# Altium PCB PCB_Bass_Tuner.PcbDoc
Units mm, origin at the board's own origin, x right, y up, seen from the top; angles counter-clockwise.
Board outline 33.66 x 66.04 mm, 2 copper layers (Top Layer, Bottom Layer); 29 components, 38 nets, 151 pads, 0 vias.
Unrouted connection lines stored in the file: 90.
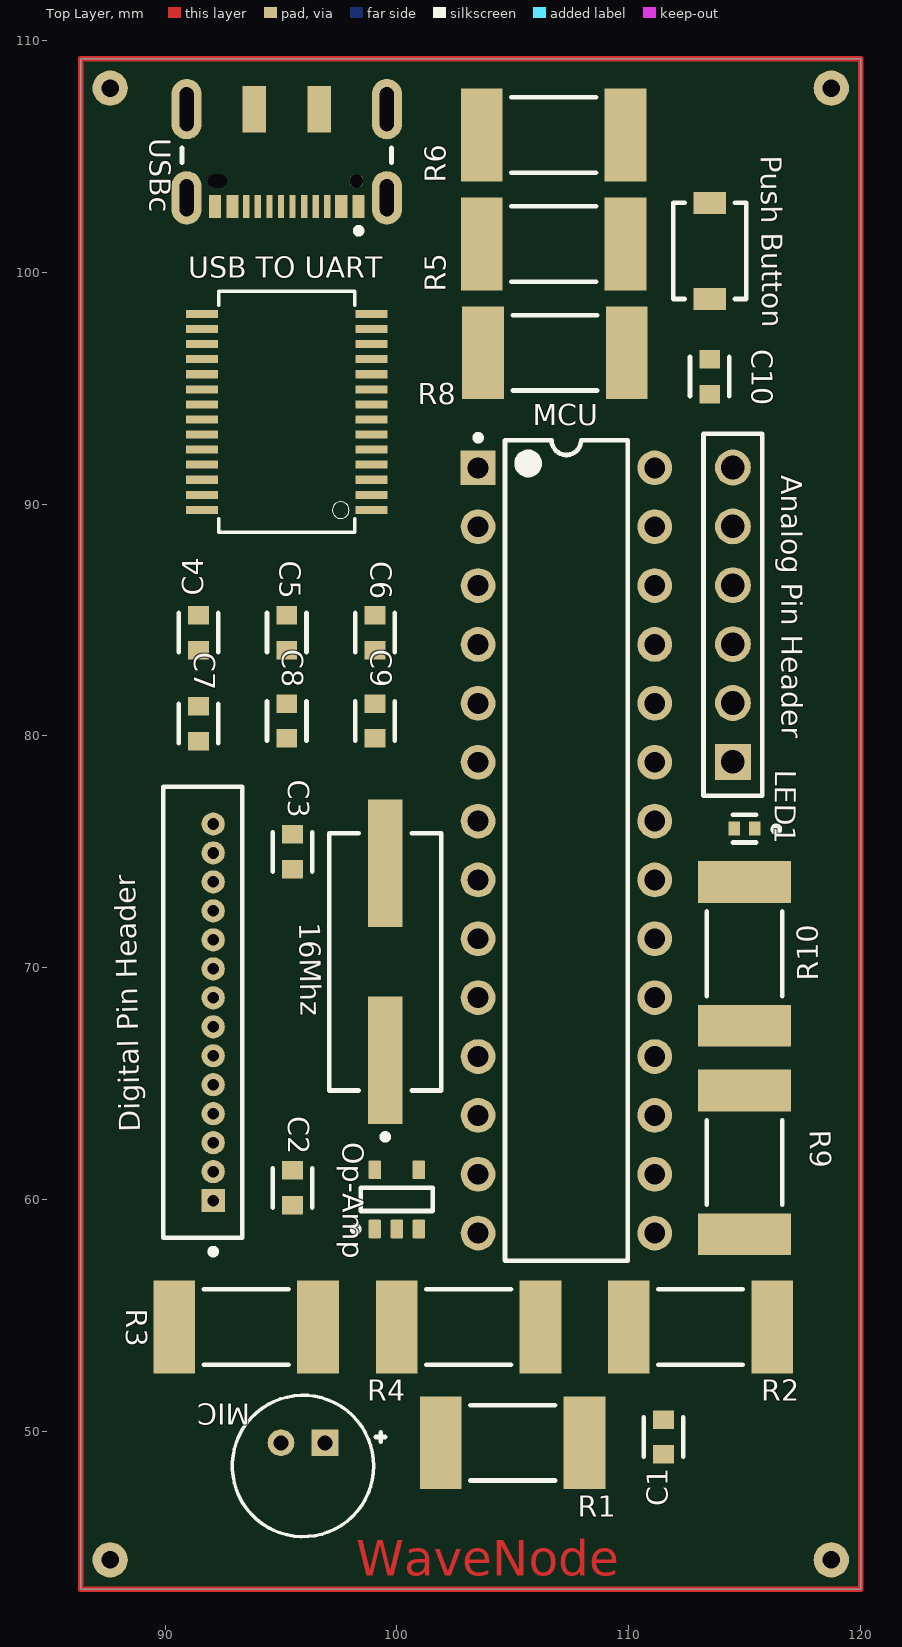
[diagram p0: Top Layer view]
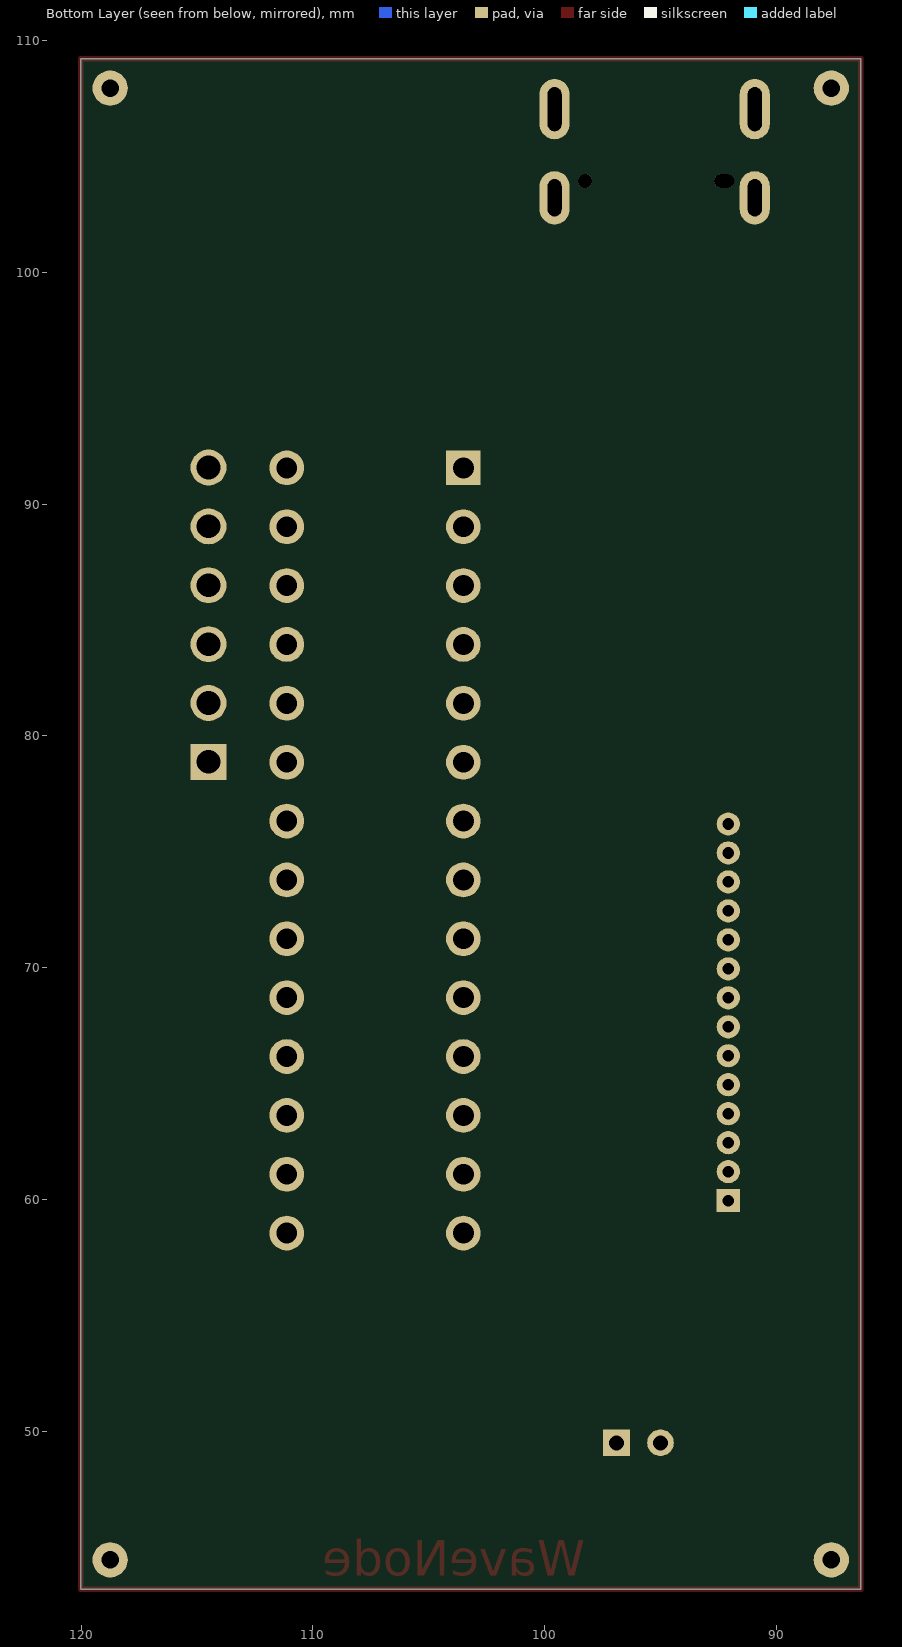
[diagram p1: Bottom Layer view, seen from below]

## Layer stack, top to bottom
Top Solder: solder mask 0.0102, Solder Resist, Dk 3.5
Top Layer: signal copper 0.0356
Dielectric 1: dielectric 0.32, FR-4, Dk 4.8
Bottom Layer: signal copper 0.0356
Bottom Solder: solder mask 0.0102, Solder Resist, Dk 3.5

## Board outline
86.36,43.18 86.36,109.22 120.015,109.22 120.015,43.18

## Design rules (kind name [scope] priority, off if disabled: settings)
Clearance [All] p1: gap=0.2 ignorepadtopadclearanceinfootprint=FALSE
DiffPairsRouting [All] p1: maxlimit=0.254 minlimit=0.254 mostfreqgap=0.254 toplayer_minwidth=0.381 toplayer_maxwidth=0.381 toplayer_prefwidth=0.381 bottomlayer_minwidth=0.381 bottomlayer_maxwidth=0.381 bottomlayer_prefwidth=0.381 maxuncoupledlength=12.7
PolygonConnect [All] p1: connectstyle=Relief reliefconductorwidth=0.254 reliefentries=4 polygonreliefangle="90 Angle" airgapwidth=0.254
RoutingVias [All] p1: holewidth=0.711 width=1.27 viastyle="Through Hole" minholewidth=0.711 minwidth=1.27 maxholewidth=0.711 maxwidth=1.27
SMDNeckDown [All] p1: percent=50.000
SolderMaskExpansion [All] p1: expansion=0.102 istentingtop=FALSE
SupplyNets "Schematic Supply Nets_1" [InNet('Ground')] p1: voltage=0.000
SupplyNets "Schematic Supply Nets" [InNet('VCC')] p2: voltage=0.000
UnRoutedNet [All] p1: checkbadconnections=TRUE
Width [All] p1: maxlimit=1 minlimit=0.127 preferedwidth=0.2 minimp=50.000000 maximp=50.000000 favimp=50.000000
28 further rules are at their usual default settings.

## Classes and differential pairs
differential pair USB_D: +USB_D_P -USB_D_N

## Components (designator, comment, footprint, x,y, rotation, side; value= is the part's Value field where it differs from the comment)
16Mhz "ATS16ASM-1" CTS-ATS-SM-XTAL-2 99.5,70.25 r90 top
"Analog Pin Header" "TSW-106-07-T-S" SMTC-TSW-106-07-X-S 114.5,78.88 r90 top
C1 "10u" FP-CC0603-DA-MFG 111.5,49.75 r90 top value="22 nF"
C2 "100n" FP-CC0603-DA-MFG 95.5,60.5 r270 top value="22 nF"
C3 "100n" FP-CC0603-DA-MFG 95.5,75 r270 top value="22 nF"
C4 "100n" FP-CC0603-DA-MFG 91.44,84.455 r90 top value="22 nF"
C5 "2.2u" FP-CC0603-DA-MFG 95.25,84.455 r270 top value="22 nF"
C6 "100n" FP-CC0603-DA-MFG 99.06,84.455 r270 top value="22 nF"
C7 "100n" FP-CC0603-DA-MFG 91.44,80.53 r270 top value="22 nF"
C8 "22p" FP-CC0603-DA-MFG 95.25,80.645 r270 top value="22 nF"
C9 "22p" FP-CC0603-DA-MFG 99.06,80.645 r270 top value="22 nF"
C10 "100n" FP-CC0603-DA-MFG 113.5,95.5 r270 top value="22 nF"
"Digital Pin Header" "53047-1410" FP-53047-1410-MFG 91.625,68.075 r270 top
LED1 "SML-P11VTT86R" FP-SML-P1-MFG 115,76 r180 top
MCU "ATmega328P-PU" 28P3 107.315,75.057 r0 top
MIC "POM-3535P-3-R" FP-POM-3535P-3-R-MFG 95.95,48.5 r180 top
Op-Amp "LM321MF" DBV0005A_L 100,60 r90 top
"Push Button" "TL1015AF160QG" FP-TL1015AF160QG-MFG 113.5,100.925 r270 top
R1 "10k" FP-AC2512-MFG 105,49.5 r180 top value=432Ω
R2 "1k" FP-AC2512-MFG 113.1,54.5 r0 top value=432Ω
R3 "10k" FP-AC2512-MFG 93.5,54.5 r180 top value=432Ω
R4 "47k" FP-AC2512-MFG 103.1,54.5 r0 top value=432Ω
R5 "5.1k" FP-AC2512-MFG 106.767,101.227 r180 top value=432Ω
R6 "5.1k" FP-AC2512-MFG 106.767,105.926 r180 top value=432Ω
R8 "10k" FP-AC2512-MFG 106.819,96.528 r180 top value=432Ω
R9 "10k" FP-AC2512-MFG 115,61.6 r90 top value=432Ω
R10 "330" FP-AC2512-MFG 115,70.6 r270 top value=432Ω
"USB TO UART" "FT232RL" SSOP28DB 95.25,93.98 r90 top
USBc "DX07S016JA1R1500" FP-DX07S016JA1R1500-MFG 95.25,106.045 r180 top

## Footprints (in the part's own frame and the unit in brackets; to place one, negate y for a bottom-side part, rotate by r counter-clockwise, add the part's x,y. Pads: shape width x height; smd on the part's side, far side on the other; paste and mask are expansions set on the pad)
28P3 [mm] "28-Pin Plastic Dual In-Line Package (PDIP)"
  rect 1.5x1.5 hole 0.9: 1(-3.81,16.51)
  round 1.5 hole 0.9: 2(-3.81,13.97) 3(-3.81,11.43) 4(-3.81,8.89) 5(-3.81,6.35) 6(-3.81,3.81) 7(-3.81,1.27) 8(-3.81,-1.27) 9(-3.81,-3.81) 10(-3.81,-6.35) 11(-3.81,-8.89) 12(-3.81,-11.43) 13(-3.81,-13.97) 14(-3.81,-16.51) 15(3.81,-16.51) 16(3.81,-13.97) 17(3.81,-11.43) 18(3.81,-8.89) 19(3.81,-6.35) 20(3.81,-3.81) 21(3.81,-1.27) 22(3.81,1.27) 23(3.81,3.81) 24(3.81,6.35) 25(3.81,8.89) 26(3.81,11.43) 27(3.81,13.97) 28(3.81,16.51)
  silkscreen extent -3.93,-17.7 2.65,17.93, body extent -3.6,-17.65 3.6,17.65, height 4.58
CTS-ATS-SM-XTAL-2 [mm] "SMD, 2-Leads, Body 11.1x4.83mm, Pitch 8.5mm"
  rect 5.5x1.5 smd: 1(-4.25,0) 2(4.25,0)
  silkscreen extent -7.67,-2.42 5.55,2.42, body extent -5.59,-2.42 5.59,2.42, height 4.3
DBV0005A_L [mm] "SOT23, 5-Leads, Body 3.05x1.75mm, Pitch 0.95mm, IPC High Density"
  rrect18% 0.8x0.55 smd: 1(-1.275,0.95) 2(-1.275,0) 3(-1.275,-0.95) 4(1.275,-0.95) 5(1.275,0.95)
  silkscreen extent -1.4,-1.55 0.5,1.9, body extent -1.42,-1.46 1.42,1.46, height 1.08
FP-53047-1410-MFG [mm]
  rect 1x1 hole 0.5 paste-2539.97 mask+0: 1(8.125,0.45)
  round 1 hole 0.5 paste-2539.97 mask+0: 2(6.875,0.45) 3(5.625,0.45) 4(4.375,0.45) 5(3.125,0.45) 6(1.875,0.45) 7(0.625,0.45) 8(-0.625,0.45) 9(-1.875,0.45) 10(-3.125,0.45) 11(-4.375,0.45) 12(-5.625,0.45) 13(-6.875,0.45) 14(-8.125,0.45)
  silkscreen extent -9.72,-1.7 10.45,1.7, body extent -9.82,-1.8 9.82,1.8, height 0.25
FP-AC2512-MFG [mm]
  rect 1.8x4 smd paste+0 mask+0: 1(-3.1,0) 2(3.1,0)
  silkscreen extent -1.82,-1.63 1.82,1.63, body extent -4.1,-2.1 4.1,2.1, height 0.25
FP-CC0603-DA-MFG [mm]
  rect 0.8x0.9 smd paste+0 mask+0: 1(-0.75,0) 2(0.75,0)
  silkscreen extent -0.85,-0.85 0.85,0.85, body extent -1.35,-0.75 1.35,0.75, height 0.25
FP-DX07S016JA1R1500-MFG [mm]
  rrect100% 1.3x2.3 hole 1.6 slot 0.6 at 0 deg paste-2539.97 mask+0: 1(-4.32,2.825) 2(4.32,2.825)
  rrect100% 1.3x2.6 hole 1.9 slot 0.6 at 0 deg paste-2539.97 mask+0: 3(-4.32,-1) 6(4.32,-1)
  rect 1x2 smd paste+0 mask+0: 4(-1.4,-1) 5(1.4,-1)
  rect 0.52x1 smd paste+0 mask+0: A1/B12(-3.1,3.2) A4/B9(-2.35,3.2) A12/B1(3.1,3.2) B4/A9(2.35,3.2)
  rect 0.27x1 smd paste+0 mask+0: A5(-1.75,3.2) A6(-0.25,3.2) A7(0.75,3.2) A8(1.75,3.2) B5(1.25,3.2) B6(0.25,3.2) B7(-0.75,3.2) B8(-1.25,3.2)
  round 0.6 hole 0.6 unplated paste-2539.97 mask+0: ""(-3,2.1)
  rrect100% 0.85x0.6 hole 0.6 slot 0.85 at 0 deg unplated paste-2539.97 mask+0: ""(3,2.1)
  silkscreen extent -4.52,0.67 4.52,4.37, body extent -5.07,-3.75 5.07,4.08, height 0.25
FP-POM-3535P-3-R-MFG [mm]
  rect 1.15x1.15 hole 0.65 paste-2539.97 mask+0: 1(-0.95,-1)
  round 1.15 hole 0.65 paste-2539.97 mask+0: 2(0.95,-1)
  silkscreen extent -3.55,-3.05 3.05,3.05, body extent -3.15,-3.15 3.15,3.15, height 0.25
FP-SML-P1-MFG [mm]
  rect 0.5x0.6 smd paste+0 mask+0: 1(-0.45,0) 2(0.45,0)
  silkscreen extent -1.5,-0.6 0.5,0.6, body extent -0.8,-0.43 0.8,0.43, height 0.25
FP-TL1015AF160QG-MFG [mm]
  rect 0.95x1.4 smd paste+0 mask+0: 1(-2.075,0) 2(2.075,0)
  silkscreen extent -2.07,-1.58 2.08,1.58, body extent -2.65,-1.68 2.65,1.68, height 0.25
SMTC-TSW-106-07-X-S [mm] ".025 SQ Post Terminal Strip Assembly, 1x6 Pins, Vertical, 2.54mm Pitch, Male"
  rect 1.55x1.55 hole 1.02: 1(0,0)
  round 1.55 hole 1.02: 2(2.54,0) 3(5.08,0) 4(7.62,0) 5(10.16,0) 6(12.7,0)
  silkscreen extent -1.46,-1.27 14.16,1.27, body extent -1.27,-1.24 13.97,1.3, height 8.38
SSOP28DB [mil]
  rect 13.7x55 smd paste+0 mask+4.02: 1(-166.34,-143.94) 2(-140.75,-143.94) 3(-115.16,-143.94) 4(-89.57,-143.94) 5(-63.98,-143.94) 6(-38.39,-143.94) 7(-12.8,-143.94) 8(12.8,-143.94) 9(38.39,-143.94) 10(63.98,-143.94) 11(89.57,-143.94) 12(115.16,-143.94) 13(140.75,-143.94) 14(166.34,-143.94) 15(166.34,143.94) 16(140.75,143.94) 17(115.16,143.94) 18(89.57,143.94) 19(63.98,143.94) 20(38.39,143.94) 21(12.8,143.94) 22(-12.8,143.94) 23(-38.39,143.94) 24(-63.98,143.94) 25(-89.57,143.94) 26(-115.16,143.94) 27(-140.75,143.94) 28(-166.34,143.94)
  silkscreen extent -205,-115 205,115, body extent -154,-201 154,201, height 79

## Part data
16Mhz: library part CMP-0585-00002-2, "ATS-SM Series Quartz Crystal, 16 MHz, -20 to 70 degC, 11.1 x 4.83 x 4.3mm SMD, RoHS, Tape and Reel", Frequency="16 MHz", Manufacturer="CTS Corporation", Operating Temperature="-20 to 70 degC", Shunt Capacitance (C0)="7.0 pF Max", ComponentLink1Description="Manufacturer URL", ComponentLink1URL=http://www.ctscorp.com/, ComponentLink2Description=Datasheet, ComponentLink2URL=http://www.ctscorp.com/components/Datasheets/008-0309-0.pdf, ComponentLink3Description="Package Specification", ComponentLink3URL=http://www.ctscorp.com/components/Datasheets/008-0309-0.pdf, Crystal Cut=AT-Cut, DatasheetVersion="Rev. K", Drive Level (Type)="100 uW", ESR Maximum="40 Ohms", Mounting Technology="Surface Mount", Oscillation Mode="Fundamental or 3rd Overtone", PackageDescription="2-Pin SMD, Body 11.1 x 4.83 mm, Pitch 8.5 mm", PackageReference=ATS-SM-XTAL-2, Packing="Tape and Reel", PartNumber=ATS16ASM-1, RoHS=TRUE
"Analog Pin Header": library part CMP-1024-00384-1, "0.025\" SQ Post Header, Through-hole, Vertical, -55 to 105 degC, 2.54 mm Pitch, 6-Pin, Male, RoHS", Manufacturer=Samtec, Temperature Range="-55 to 105 degC", ComponentLink1Description="Manufacturer URL", ComponentLink1URL=http://www.samtec.com, ComponentLink2Description=Datasheet, ComponentLink2URL=http://www.samtec.com/documents/webfiles/pdf/TSW_TH.PDF, ComponentLink3Description="Package Specification", ComponentLink3URL=http://www.samtec.com/documents/webfiles/cpdf/TSW-XXX-XX-XXX-X-XX-XXX-MKT.pdf, DatasheetVersion=F-214, Mounting Technology=Through-hole, Orientation=Vertical, PackageDescription=".025[0.64] SQ. Post Terminal Strip Assembly", PackageReference=TSW-106-07-X-S, PackageVersion="DM, 8/1988", PartNumber=TSW-106-07-T-S, Pitch="2.54 mm", RoHS=True
C1 C2 C3 C4 C5 C6 C7 C8 C9 C10: library part CMP-03422-000397-1, "CC0603 22 nF X7R 20.00% 50 V", Capacitance="22 nF", Manufacturer=YAGEO, Manufacturer Part Number=CC0603MRX7R9BB223, Package=CC0603-DA, Temperature="-55°C to +125°C", Temperature Characteristic=X7R, Temperature Coefficient=15%, Temperature Range High=+125°C, Temperature Range Low=-55°C, Tolerance=0.2, Voltage="50 V", Automotive=No, Category=Cap, ComponentLink2Description=Datasheet, ComponentLink2URL=http://www.yageo.com/documents/recent/UPY-GPHC_X7R_6.3V-to-50V_18.pdf, Device Class L1="Passive Components", Device Class L2=Capacitors, Device Class L3="Ceramic Capacitors", Footprint Url=http://www.yageo.com/exep/pages/download/literatures/UPY-C_GEN_24.pdf, Height=0.9mm, Lead Free=Yes, Material=Ceramic, Mouser Description="Surface Mount Ceramic Multilayer Capacitor 0.022uF 20% X7R 50V 0603 Paper T/R", Octopart=https://octopart.com/cc0603mrx7r9bb223-yageo-88025763, RoHS=TRUE, Voltage Rating="50 V"
"Digital Pin Header": library part CMP-04776-000893-1, "CONN HEADER VERT 14POS 1.25MM", Color=Natural, Contact Resistance=20mR, Current Rating=1A, Flammability Rating="UL94 V-0", Insulation Resistance=100MR, Manufacturer Series=53047, Max Operating Temperature=85°C, Min Operating Temperature=-40°C, Package Quantity=100, Voltage Rating=125V, Body Plating=Tin, Connector Type="Blade Pin", Contact Finish - Mating=TIN, Contact Finish - Termination=TIN, Contact Gender=Male, Contact Material=Bronze, Contact Mating Length=0.089inch, Contact Plating=Tin, Contact Type="Blade Pin", DIN Conformance=No, Filter Feature=No, Gender=Male, Glow Wire Compliant=Non-compliant, Housing Color=Natural, IEC Conformance=No, Lead Free="Lead Free", Lead Pitch=1.25mm, MIL Conformance=No, Mixed Contacts=No, Mount="Through Hole", Mounting Style=STRAIGHT, Number of Circuits=14, Number of Contacts=14, Number of Poles=14, Number of Positions=14, Number of Rows=1, Number of Rows Loaded=1, Option="General Purpose", Orientation=Vertical, Packaging=Tray, Pitch=1.25mm, Radiation Hardening=No, RoHS Compliant=Yes, Series=PicoBlade, Termination=Solder, Voltage Rating (AC)=125V, Voltage Rating (DC)=125V, Working Voltage=125V
LED1: library part CMP-08952-000003-1, "LED RED CLEAR 1006 SMD", Colour=Red, Forward Current=1mA, Forward Voltage=1.8V, Manufacturer=Rohm, Package=SML-P1, Power Dissipation=50mW, Reverse Voltage=5V, Temperature="-40°C to +85°C", Temperature Range High=+85°C, Temperature Range Low=-40°C, Automotive=No, Category=Diode, ComponentLink2Description=Datasheet, ComponentLink2URL=https://www.rohm.com/datasheet/SML-P11VT(R)/sml-p11-e, Device Class L1=Optoelectronics, Device Class L2=LEDs, Device Class L3=unset, Digikey Description="LED RED CLEAR 1006 SMD", Height=0.25mm, Lead Free=Yes, Led Orientation="Top View", Luminous Intensity=4mcd, Manufacturer Part Number=SML-P11VTT86R, Mouser Description="SML-P11 Series Red 0402 Clear 4 mcd 1.8 V Surface Mount PICOLED? LED", Octopart=https://octopart.com/sml-p11vtt86r-rohm-34112314, RoHS=TRUE, Wavelength=626nm
MCU: library part CMP-0095-00013-2, "8-bit AVR Microcontroller, 32KB Flash, 1KB EEPROM, 2KB SRAM, 28-pin PDIP, Industrial Grade (-40°C to 85°C)", ComponentLink1Description="Manufacturer URL", ComponentLink1URL=http://www.atmel.com/, ComponentLink2Description="ATmega48A/48PA/88A/88PA/168A/168PA/328/328P Datasheet", ComponentLink2URL=http://www.atmel.com/dyn/resources/prod_documents/8271.pdf, ComponentLink3Description="ATmega48A/48PA/88A/88PA/168A/168PA/328/328P Summary", ComponentLink3URL=http://www.atmel.com/dyn/resources/prod_documents/8271S.pdf, DatasheetVersion="revD, May-2011", PackageDescription="28-lead (0.300\"/7.62mm Wide) Plastic Dual Inline Package (PDIP)", PackageReference=28P3, PackageVersion="revB, Sep-2001", RevisionNote="DatasheetVersion updated. URLs added."
MIC: library part CMP-231723-000001-1, "MIC COND ANALOG OMNI -35DB 6MM D", Operating Supply Current=500uA, Package Quantity=100, Resistance=2200R, Voltage Rating=2V, Depth=3.7mm, Diameter=6mm, Direction=Omnidirectional, Height=3.7mm, Impedance=2.2kR, Mount="Through Hole", Output Type=Analog, Packaging=Bulk, Shape=Round, Termination="PC Pins"
Op-Amp: library part CMP-0055-01325-3, "Low Power Single Op Amp, 5-pin SOT-23", Manufacturer="Texas Instruments", Package Reference=DBV0005A, PackageTopMarking=A63A*XTT, PowerWise=N, ComponentLink1Description="Datasheet URL", ComponentLink1URL=http://www.ti.com/general/docs/lit/getliterature.tsp?genericPartNumber=LM321&fileType=pdf, CompType=Amplifiers, PackageDescription="Molded SOT-23, .115 x .063 x .040 in Body, 5 Lead, .0375 in Pitch", PinCount=5, RoHS=N
"Push Button": library part CMP-17879-000003-1, "SWITCH TACTILE SPST-NO 0.05A 12V", Case/Package=SMD/SMT, Color=Beige, Contact Current Rating=50mA, Contact Resistance=100mR, Max Operating Temperature=70°C, Max Voltage Rating (DC)=12V, Min Operating Temperature=-20°C, Operating Force=160gf, Package Quantity=1, Actuator Length=0.5mm, Actuator Material=Nylon, Actuator Type=Standard, Contact Material=Silver, Contact Plating=Silver, Current Rating=50mA, Electrical Life=50000Cycles, Illumination Type=Non-Illuminated, Lead Free="Lead Free", Mechanical Life=200000Cycles, Mount="Surface Mount", Orientation=Straight, Packaging="Tape and Reel", REACH SVHC="No SVHC", Switch Function=Off-Mom, Switch Travel=0.2mm, Termination="Gull Wing", Throw Configuration=SPST, Voltage Rating (DC)=12V
R1 R2 R3 R4 R5 R6 R8 R9 R10: library part CMP-03412-028006-1, "RES SMD 432 OHM 1% 1W 2512", Manufacturer=Yageo, Manufacturer Part Number=AC2512FK-07432RL, Package=AC2512, Power Rating=1W, Resistance=432Ω, Temperature="-55°C to +155°C", Temperature Range High=+155°C, Temperature Range Low=-55°C, Tolerance=0.01, Voltage Rating=200V, Automotive=Yes, Automotive Grade="Grade 0", Category=Res, ComponentLink2Description=Datasheet, ComponentLink2URL=http://www.yageo.com/documents/recent/PYu-AC_51_RoHS_L_6.pdf, Composition="Thick Film", Device Class L1="Passive Components", Device Class L2=Resistors, Device Class L3="Chip SMD Resistors", Digikey Description="RES SMD 432 OHM 1% 1W 2512", Footprint Url=http://www.yageo.com/exep/pages/download/literatures/PYu-R_Mount_10.pdf, Height=0.65mm, Ipc Land Pattern Name=RESC635310X55, Lead Free=Yes, Octopart=https://octopart.com/ac2512fk-07432rl-yageo-71370083, RoHS=TRUE, Series=AC
"USB TO UART": "IC, USB TO UART, SMD, 28SSOP; Bridge Type:USB to UART; Supply Voltage Min:1.8V; Supply Voltage Max:5.25V; Interface Case Style:SSOP; No. of Pins:28Pins; Operating Temperature Min:-40Â°C; Operating Temperature Max:85Â°C; Product Range:FT232; Automotive Qua", Package="SSOP-28 FTDI, Future", Check_prices=https://www.snapeda.com/parts/FT232RLREEL/FTDI/view-part/?ref=eda, MF="FTDI Chip", MP=FT232RLREEL, SnapEDA_Link=https://www.snapeda.com/parts/FT232RLREEL/FTDI/view-part/?ref=snap
USBc: library part CMP-19038-000003-1, "CONN RCP USB2.0 TYP C 24P SMD RA"

## Free pads (board coordinates)
  round 1.524 hole 0.762: 1(87.63,107.95) 2(118.745,107.95) 3(87.63,44.45) 4(118.745,44.45)

## Nets (pads, with @x,y where several pads share a name; then routed paths per layer and width w, separated by ;. In a path a pad name is that pad's centre, name@x,y a point inside that pad or via, vN(x,y) a via of type N, cw(c..) or ccw(c..) an arc to the next point about the centre after c; other vN are vias at no path point)
Ground: "Push Button.1" "USB TO UART.7" "USB TO UART.18" "USB TO UART.21" "USB TO UART.25" "USB TO UART.26" C2.1 C3.1 C4.1 C5.1 C6.1 C7.1 C8.1 C9.1 LED1.1 MCU.8 MCU.22 MIC.1 Op-Amp.5 R3.1 R5.1 R6.1 USBc.1 USBc.2 USBc.3 USBc.4 USBc.5 USBc.6 USBc.A1/B12 USBc.A12/B1
Net16Mhz_1: 16Mhz.1 C8.2 MCU.10
Net16Mhz_2: 16Mhz.2 C9.2 MCU.9
"NetAnalog Pin Header_1": "Analog Pin Header.1" MCU.23
"NetAnalog Pin Header_2": "Analog Pin Header.2" MCU.24
"NetAnalog Pin Header_3": "Analog Pin Header.3" MCU.25
"NetAnalog Pin Header_4": "Analog Pin Header.4" MCU.26
"NetAnalog Pin Header_5": "Analog Pin Header.5" MCU.27
"NetAnalog Pin Header_6": "Analog Pin Header.6" MCU.28
NetC1_1: C1.1 MIC.2 R1.1
NetC1_2: C1.2 R2.1
NetC2_2: C2.2 Op-Amp.1 R3.2 R9.1
NetC3_2: "USB TO UART.4" "USB TO UART.17" C3.2
NetC4_2: "USB TO UART.19" "USB TO UART.20" C4.2 USBc.A4/B9 USBc.B4/A9
NetC10_1: "Push Button.2" C10.1 MCU.1 R8.1
NetC10_2: "USB TO UART.2" C10.2
"NetDigital Pin Header_1": "Digital Pin Header.1" MCU.4
"NetDigital Pin Header_2": "Digital Pin Header.2" MCU.5
"NetDigital Pin Header_3": "Digital Pin Header.3" MCU.6
"NetDigital Pin Header_4": "Digital Pin Header.4" MCU.11
"NetDigital Pin Header_5": "Digital Pin Header.5" MCU.12
"NetDigital Pin Header_6": "Digital Pin Header.6" MCU.13
"NetDigital Pin Header_7": "Digital Pin Header.7" MCU.14
"NetDigital Pin Header_8": "Digital Pin Header.8" MCU.15
"NetDigital Pin Header_9": "Digital Pin Header.9" MCU.16
"NetDigital Pin Header_10": "Digital Pin Header.10" MCU.17
"NetDigital Pin Header_11": "Digital Pin Header.11" MCU.18
"NetDigital Pin Header_12": "Digital Pin Header.12" MCU.19 R10.2
"NetDigital Pin Header_13": "Digital Pin Header.13" "USB TO UART.1" MCU.3
"NetDigital Pin Header_14": "Digital Pin Header.14" "USB TO UART.5" MCU.2
NetLED1_2: LED1.2 R10.1
NetOp-Amp_3: Op-Amp.3 R2.2 R4.1
NetOp-Amp_4: Op-Amp.4 R4.2
NetR5_2: R5.2 USBc.A5
NetR6_2: R6.2 USBc.B5
USB_D_N: "USB TO UART.16" USBc.A7 USBc.B7
USB_D_P: "USB TO UART.15" USBc.A6 USBc.B6
VCC: C5.2 C6.2 C7.2 MCU.7 MCU.20 Op-Amp.2 R1.2 R8.2 R9.2
pads on no net: "USB TO UART.3" "USB TO UART.6" "USB TO UART.8" "USB TO UART.9" "USB TO UART.10" "USB TO UART.11" "USB TO UART.12" "USB TO UART.13" "USB TO UART.14" "USB TO UART.22" "USB TO UART.23" "USB TO UART.24" "USB TO UART.27" "USB TO UART.28" MCU.21 USBc. USBc.A8 USBc.B8
copper on no net: | length 199.4
  Top Layer w0.254: 86.36,43.18 120.015,43.18 120.015,109.22 86.36,109.22 86.36,43.18

## Other copper
Top Layer:
  text "WaveNode" at 98.254,43.754 h1.52